# Altium PCB MP3_Player.PcbDoc (part 2 of 2)
Units mm, origin at the board's own origin, x right, y up, seen from the top; angles counter-clockwise.
Board outline 65.25 x 90.42 mm, 2 copper layers (Top Layer, Bottom Layer), stack 1.581 mm thick; 93 components, 53 nets, 312 pads, 294 vias.
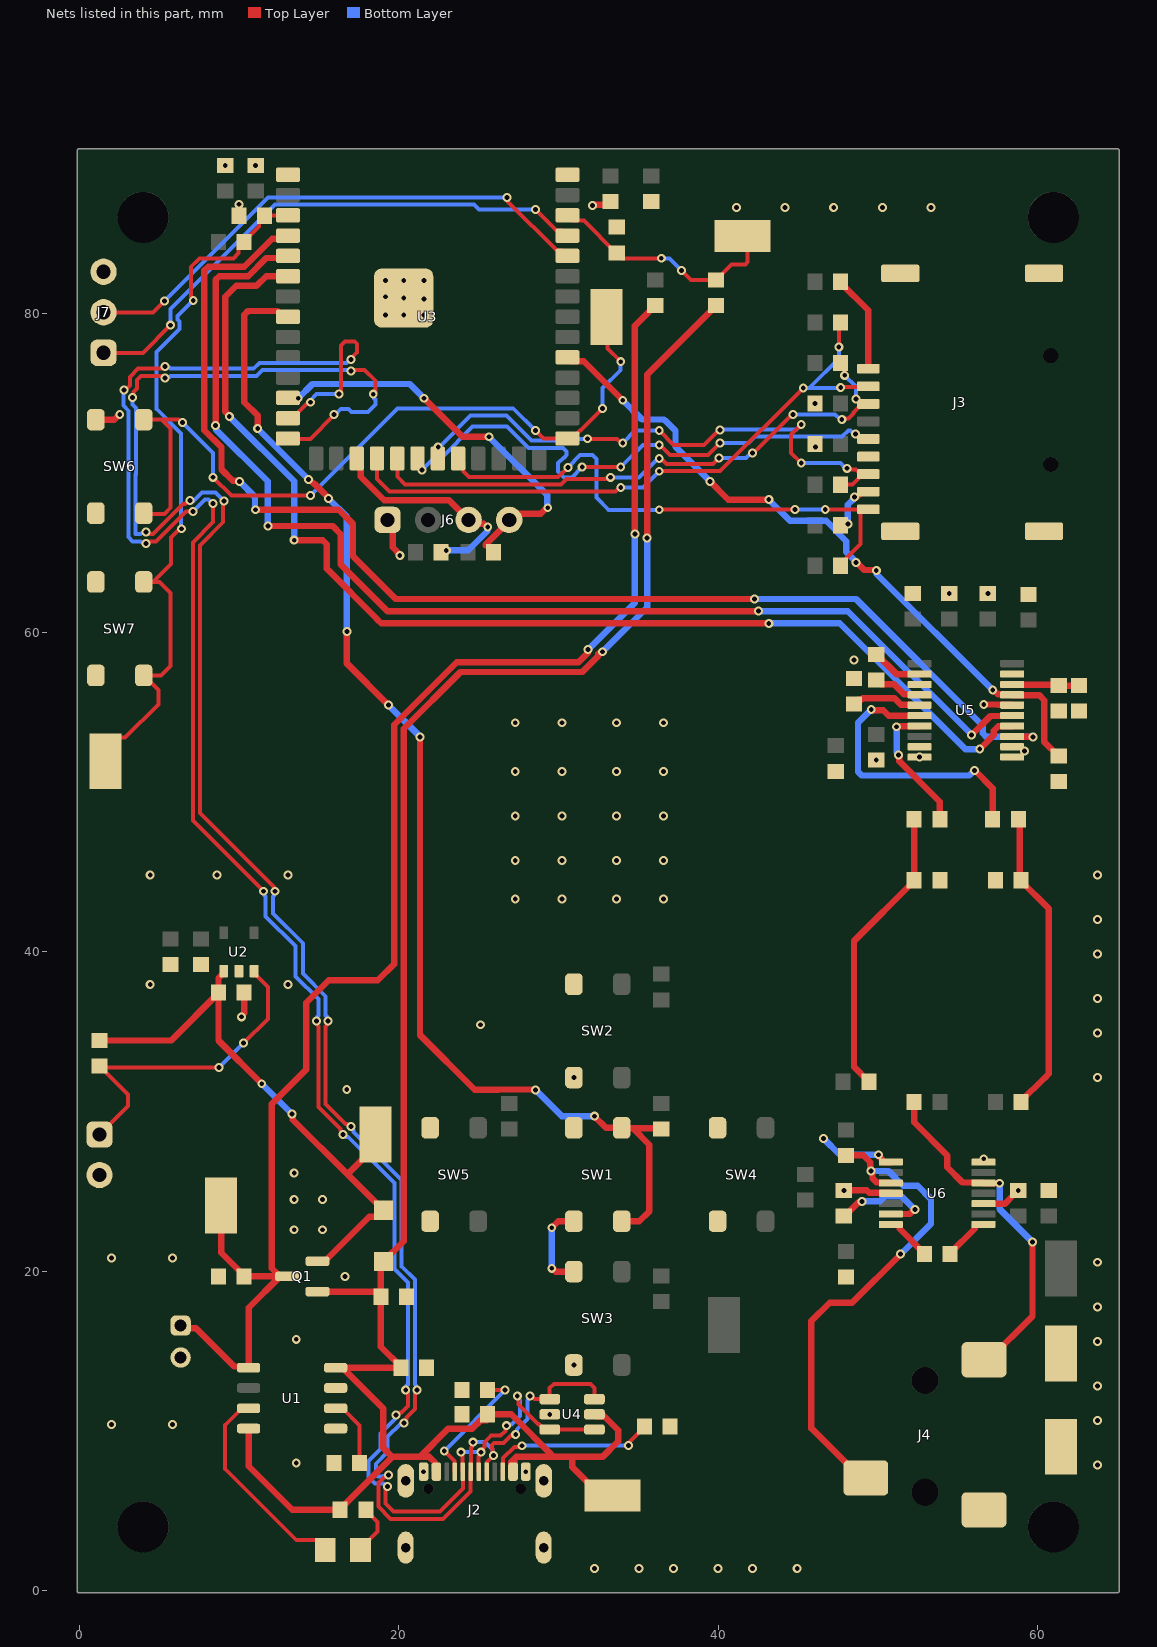
[diagram p2: the nets of this part, all layers, seen from the top]

## Via types
v1: diameter 0.559, hole 0.305, Top Layer to Bottom Layer, tented both sides, 294 vias

## Nets (pads, with @x,y where several pads share a name; then routed paths per layer and width w, separated by ;. In a path a pad name is that pad's centre, name@x,y a point inside that pad or via, vN(x,y) a via of type N, cw(c..) or ccw(c..) an arc to the next point about the centre after c; other vN are vias at no path point) (continued)
BTN_UP_N: R9.2 SW1.2 U3.8 | length 77.9
  Top Layer w0.4: v1(11.176,72.771) 11.176,73.593 10.339,74.431 10.339,79.903 10.573,80.137 12.409,80.137 12.77,79.776 U3.8@13.07,79.776 ; v1(14.351,69.596) 14.405,69.596 14.721,69.28 14.768,69.28 15.621,68.427 v1(15.621,68.391) ; v1(16.764,60.071) 16.764,58.062 v1(19.356,55.47) ; v1(21.336,53.467) 21.336,34.798 24.765,31.369 26.231,31.369 26.25,31.388 28.556,31.388 v1(28.575,31.369) ; v1(32.258,29.718) 32.988,28.988 SW1.2@33.974,28.988 34.009,28.953 34.671,28.953 ; SW1.2@33.974,23.138 35.076,23.138 35.687,23.749 35.687,27.94 34.674,28.953 34.671,28.953 ; R9.2@36.449,28.918 36.414,28.953 34.671,28.953
  Bottom Layer w0.4: v1(11.176,72.771) v1(14.351,69.596) ; v1(15.621,68.391) 16.764,67.248 v1(16.764,60.071) ; v1(19.356,55.47) 21.336,53.49 v1(21.336,53.467) ; v1(28.575,31.369) 30.226,29.718 v1(32.258,29.718)
DAC_L: C13.1 R26.2 R29.1 | length 19.2
  Top Layer w0.4: R26.2@58.801,48.307 58.884,48.224 58.884,44.58 C13.1@58.966,44.497 58.966,44.459 60.706,42.719 60.706,32.365 60.472,32.131 60.452,32.131 58.966,30.645 R29.1@58.966,30.607
DAC_R: C20.1 R27.2 R30.1 | length 18.4
  Top Layer w0.4: R30.1@49.441,31.877 48.514,32.804 48.514,40.687 52.286,44.459 C20.1@52.286,44.497 R27.2@52.286,48.307
DAC_XSMT: R32.2 U3.31 U5.17 | length 43.8
  Top Layer w0.4: U3.31@30.57,77.236 30.82,76.986 31.599,76.986 v1(34.036,74.549) ; v1(39.497,69.469) 40.514,68.452 40.64,68.326 v1(43.18,68.326) ; v1(48.641,64.389) 48.695,64.389 49.165,63.919 49.873,63.919 v1(49.911,63.881) ; v1(57.202,56.401) 57.24,56.362 57.303,56.362 57.538,56.127 58.396,56.127 58.446,56.077 60.128,56.077 60.433,55.772 60.433,53.152 61.303,52.282 R32.2@61.341,52.282
  Bottom Layer w0.4: v1(34.036,74.549) 35.241,73.344 36.612,73.344 36.677,73.279 36.703,73.279 37.338,72.644 37.338,71.628 v1(39.497,69.469) ; v1(43.18,68.326) 44.51,66.996 46.77,66.996 48.037,65.729 48.037,65.047 48.641,64.443 v1(48.641,64.389) ; v1(49.911,63.881) 49.949,63.843 49.949,63.653 v1(57.202,56.401)
DAT1: J3.8 R23.2 | length 3.4
  Top Layer w0.4: R23.2@47.663,66.722 47.705,66.764 48.095,66.764 v1(48.133,66.802) ; v1(48.551,68.48) 48.59,68.518 48.719,68.518 49.023,68.822 J3.8@49.413,68.822
  Bottom Layer w0.4: v1(48.133,66.802) 48.133,68.008 48.551,68.426 v1(48.551,68.48)
DAT2: J3.1 R24.2 | length 6.2
  Top Layer w0.4: R24.2@47.663,81.962 47.663,81.924 49.413,80.174 J3.1@49.413,76.522
EN: C9.1 R16.2 SW7.1 TP8.1 U3.3 | length 45.9
  Top Layer w0.25: TP8.1@1.651,51.943 1.651,52.551 2.526,53.426 2.88,53.426 4.953,55.499 4.953,56.407 SW7.1@4.04,57.32 5.123,57.32 5.715,57.912 5.715,62.484 5.029,63.17 4.623,63.17 ; SW7.1@4.04,63.17 4.623,63.17 ; v1(6.398,66.5) 6.315,66.5 6.236,66.421 6.223,66.421 5.751,65.949 5.751,64.298 4.623,63.17 ; v1(7.139,80.804) 7.139,80.899 6.985,81.053 6.985,82.893 7.531,83.439 9.652,83.439 9.98,83.767 9.98,84.11 R16.2@10.325,84.455 10.325,84.493 11.25,85.418 11.25,85.761 C9.1@11.595,86.106 11.615,86.126 U3.3@13.07,86.126
  Bottom Layer w0.25: v1(6.398,66.5) 6.379,66.519 6.379,72.463 4.826,74.016 4.826,77.572 6.272,79.017 6.272,79.479 6.146,79.604 6.146,79.811 v1(7.139,80.804)
GND: C1.1 C2.2 C3.2 C4.2 C5.2 C6.1 C7.2 C8.2 C9.2 C10.2 C11.2 C12.2 C13.2 C14.2 C15.2 C16.2 C17.2 C18.2 C19.2 C20.2 C21.2 C22.2 C25.2 C26.2 C27.2 C28.1 J1.2 J2.0 J2.A1/B12 J2.B1/A12 J3.6 J3.G1 J3.G2 J3.G3 J3.G4 J4.1 J5.2 J6.1 J7.3 R2.1 R3.1 R7.2 R8.1 R17.1 R18.1 R31.1 R32.1 SW1.1 SW2.1 SW3.1 SW4.1 SW5.1 SW6.1 SW7.2 TP7.1 TP17.1 U1.1 U1.3 U2.2 U3.1 U3.40 U3.41 U4.2 U5.3 U5.9 U5.10 U5.11 U5.12 U5.16 U5.19 U6.1 U6.4 U6.10 U6.14 | length 25.1
  Top Layer w0.4: SW6.1@1.04,73.33 2.19,73.33 2.52,73.66 v1(2.54,73.66) ; v1(10.16,35.941) 10.16,35.995 10.325,36.16 C3.2@10.325,37.465 ; J6.1@19.304,67.056 19.793,66.567 19.743,66.567 19.623,66.447 19.623,65.343 20.074,64.892 v1(20.074,64.837) ; v1(29.591,20.193) 29.645,20.193 29.85,19.988 SW3.1@30.974,19.988 ; v1(29.591,22.733) 29.996,23.138 SW1.1@30.974,23.138 ; v1(32.131,86.741) 32.169,86.779 33.049,86.779 C6.1@33.274,87.004 ; v1(47.879,25.057) 47.906,25.084 49.312,25.084 49.479,24.917 50.796,24.917 U6.4@50.821,24.892 ; v1(50.048,27.304) 50.048,27.25 50.271,27.027 50.271,26.867 50.296,26.842 U6.1@50.821,26.842 ; U6.10@56.621,24.242 57.971,24.242 58.493,24.764 58.493,24.787 58.763,25.057 v1(58.801,25.057) ; v1(56.642,55.499) 57.516,55.499 57.538,55.477 58.396,55.477 U5.16@58.421,55.452
  Bottom Layer w0.4: v1(29.591,20.193) v1(29.591,22.733) ; v1(46.609,28.321) 47.626,27.304 v1(50.048,27.304)
  other v1: 32.258,1.397 35.052,1.397 37.211,1.397 40.005,1.397 42.164,1.397 44.958,1.397 21.565,7.458 27.965,7.458 63.754,7.874 13.589,8.001 2.032,10.414 5.842,10.414 63.754,10.668 29.461,11.049 63.754,12.827 30.974,14.138 63.754,15.621 13.589,15.748 63.754,17.78 16.637,19.685 63.754,20.574 2.032,20.828 5.842,20.828 13.462,22.606 15.24,22.606 13.462,24.511 15.24,24.511 13.462,26.162 56.642,27.051 16.753,31.381 30.974,32.138 63.754,32.131 63.754,34.925 25.135,35.445 63.754,37.084 4.445,37.973 13.081,37.973 63.754,39.878 63.754,42.037 27.305,43.307 30.226,43.307 33.655,43.307 36.576,43.307 4.445,44.831 8.636,44.831 13.081,44.831 63.754,44.831 27.305,45.72 30.226,45.72 33.655,45.72 36.576,45.72 27.305,48.514 30.226,48.514 33.655,48.514 36.576,48.514 27.305,51.308 30.226,51.308 33.655,51.308 36.576,51.308 49.911,52.032 52.621,52.202 59.182,52.578 27.305,54.356 30.226,54.356 33.655,54.356 36.576,54.356 48.514,58.293 56.896,62.442 54.483,62.459 46.101,71.628 46.063,74.342 19.177,79.883 20.32,79.883 21.59,79.883 21.59,80.899 20.32,80.946 19.177,81.026 19.177,82.042 20.32,82.042 21.59,82.042 41.148,86.614 44.196,86.614 47.244,86.614 50.292,86.614 53.34,86.614 10.008,86.817 9.144,89.239 11.049,89.239
I2S_BCK: U3.4 U5.13 | length 80.1
  Top Layer w0.4: v1(10.033,69.469) 10.003,69.499 9.622,69.499 8.912,70.209 8.912,71.606 7.839,72.679 7.839,82.678 8.073,82.912 10.326,82.912 12.079,84.665 12.879,84.665 U3.4@13.07,84.856 ; v1(11.049,67.691) 16.256,67.691 17.145,66.802 17.145,64.77 19.812,62.103 v1(42.291,62.103) ; U5.13@58.421,53.502 58.438,53.484 59.716,53.484 v1(59.733,53.467) v1@59.771,53.429
  Bottom Layer w0.4: v1(10.033,69.469) 11.011,68.491 11.011,67.729 v1(11.049,67.691) ; v1(42.291,62.103) 48.641,62.103 56.58,54.164 56.58,53.701 56.814,53.467 v1(59.733,53.467)
I2S_DIN: U3.6 U5.14 | length 73.5
  Top Layer w0.4: v1(9.398,73.533) 9.398,73.587 9.139,73.846 9.139,81.021 9.83,81.712 11.1,81.712 11.704,82.316 U3.6@13.07,82.316 ; v1(13.462,65.786) 15.24,65.786 15.494,65.532 15.494,64.008 18.669,60.833 18.669,60.813 18.903,60.579 v1(43.18,60.579) ; v1(56.388,52.705) 57.271,53.588 57.271,53.86 57.538,54.127 58.396,54.127 U5.14@58.421,54.152
  Bottom Layer w0.4: v1(9.398,73.533) 13.462,69.469 v1(13.462,65.786) ; v1(43.18,60.579) 47.625,60.579 47.751,60.453 55.499,52.705 v1(56.388,52.705)
I2S_LRCK: U3.5 U5.15 | length 75.6
  Top Layer w0.4: v1(8.539,72.969) 8.539,82.078 8.773,82.312 10.574,82.312 11.721,83.459 12.943,83.459 U3.5@13.07,83.586 ; v1(11.811,66.675) 15.875,66.675 16.383,66.167 16.383,64.262 19.304,61.341 v1(42.545,61.341) ; v1(55.88,53.594) 57.063,54.777 58.396,54.777 U5.15@58.421,54.802
  Bottom Layer w0.4: v1(8.539,72.969) 8.569,72.939 8.569,72.711 11.811,69.469 v1(11.811,66.675) ; v1(42.545,61.341) 48.133,61.341 v1(55.88,53.594)
IO0: SW6.2 TP9.1 U3.27 | length 49.6
  Top Layer w0.25: SW6.2@4.04,67.48 4.083,67.437 5.334,67.437 5.715,67.818 5.715,72.771 5.156,73.33 ; SW6.2@4.04,73.33 5.156,73.33 ; v1(6.477,73.152) 6.382,73.152 6.204,73.33 5.156,73.33 ; v1(8.382,69.723) 9.525,68.58 v1(14.478,68.58) ; v1(28.575,72.644) 29.063,72.156 U3.27@30.57,72.156 30.87,72.156 31.365,72.651 31.389,72.651 32.766,74.028 v1(32.766,74.041) ; TP9.1@33.02,79.756 33.094,79.682 33.094,77.777 v1(33.909,76.962)
  Bottom Layer w0.25: v1(6.477,73.152) 8.382,71.247 v1(8.382,69.723) ; v1(14.478,68.58) 19.939,74.041 27.178,74.041 v1(28.575,72.644) ; v1(32.766,74.041) 32.766,75.311 33.909,76.454 v1(33.909,76.962)
IO43: J7.1 U3.37 | length 34.3
  Top Layer w0.25: J7.1@1.524,77.517 3.984,77.517 v1(5.715,79.248) ; v1(28.575,86.487) 29.881,85.181 30.245,85.181 U3.37@30.57,84.856
  Bottom Layer w0.25: v1(5.715,79.248) 5.715,80.264 12.25,86.799 24.712,86.799 25.024,86.487 v1(28.575,86.487)
IO44: J7.2 U3.36 | length 33.7
  Top Layer w0.25: J7.2@1.524,80.057 4.619,80.057 v1(5.334,80.772) ; v1(26.797,87.249) 26.864,87.182 26.864,86.968 29.921,83.911 30.245,83.911 U3.36@30.57,83.586
  Bottom Layer w0.25: v1(5.334,80.772) 11.811,87.249 v1(26.797,87.249)
NetC23_1: C23.1 U5.2 | length 3.2
  Top Layer w0.4: C23.1@49.911,58.632 49.949,58.632 51.179,57.402 U5.2@52.621,57.402
NetC23_2: C23.2 U5.4 | length 3.1
  Top Layer w0.4: C23.2@49.911,57.032 50.181,56.762 51.019,56.762 51.654,56.127 52.596,56.127 U5.4@52.621,56.102
NetC24_1: C24.1 U6.8 | length 3
  Top Layer w0.4: C24.1@54.521,21.082 54.521,21.12 56.071,22.67 56.071,22.917 56.096,22.942 U6.8@56.621,22.942
NetC24_2: C24.2 U6.7 | length 3
  Top Layer w0.4: U6.7@50.821,22.942 51.346,22.942 51.371,22.917 51.371,22.67 52.921,21.12 C24.2@52.921,21.082
NetC25_1: C25.1 U5.5 | length 4.4
  Top Layer w0.4: C25.1@48.514,55.524 48.784,55.794 48.971,55.794 49.056,55.88 51.052,55.88 51.455,55.477 51.937,55.477 52.071,55.477 52.096,55.452 U5.5@52.621,55.452
NetC26_1: C26.1 C27.1 U5.18 | length 4.4
  Top Layer w0.4: U5.18@58.421,56.752 58.446,56.727 C27.1@61.341,56.727 ; C27.1@61.341,56.68 C26.1@62.611,56.68 C26.1@62.801,56.68
NetC28_2: C28.2 U6.6 | length 6.9
  Top Layer w0.4: C28.2@47.879,23.457 47.917,23.457 48.806,24.346 48.984,24.346 v1(49.022,24.384) ; U6.6@50.821,23.592 51.997,23.592 52.281,23.876 v1(52.324,23.876)
  Bottom Layer w0.4: v1(49.022,24.384) 50.141,24.384 50.446,24.689 51.511,24.689 v1(52.324,23.876)
NetD2_1: D2.1 R1.1 | length 3.3
  Top Layer w0.25: D2.1@17.61,2.54 17.61,2.64 18.669,3.699 18.669,4.318 17.945,5.042 R1.1@17.945,5.08
NetD2_2: D2.2 U1.7 | length 13.1
  Top Layer w0.25: U1.7@10.61,11.43 10.185,11.43 9.144,10.389 9.144,7.62 13.599,3.165 14.885,3.165 15.41,2.64 D2.2@15.41,2.54
NetJ2_A5: J2.A5 R17.2 | length 8.1
  Top Layer w0.25: v1(22.86,8.763) 23.49,8.133 23.49,7.482 J2.A5@23.515,7.458 ; R17.2@25.565,12.573 v1(26.67,12.573)
  Bottom Layer w0.25: v1(22.86,8.763) v1(26.67,12.573)
NetJ2_B5: J2.B5 R18.2 | length 10.6
  Top Layer w0.25: J2.B5@26.515,7.458 26.54,7.482 26.54,8.301 27.255,9.016 27.658,9.016 v1(27.725,9.082) ; v1(34.395,9.103) 34.462,9.17 34.462,9.316 35.395,10.249 R18.2@35.395,10.287
  Bottom Layer w0.25: v1(27.725,9.082) 34.374,9.082 v1(34.395,9.103)
NetR3_2: R3.2 U1.2 | length 4.3
  Top Layer w0.25: U1.2@16.06,11.43 16.485,11.43 17.564,10.351 R3.2@17.564,8.001
NetR26_1: R26.1 U5.6 | length 18.5
  Top Layer w0.4: v1(49.595,55.18) 49.633,55.142 50.355,55.142 50.695,54.802 U5.6@52.621,54.802 ; v1(56.07,51.371) 57.201,50.241 R26.1@57.201,48.307
  Bottom Layer w0.4: v1(49.595,55.18) 48.768,54.353 48.768,51.288 49.002,51.054 55.736,51.054 56.054,51.371 v1(56.07,51.371)
NetR27_1: R27.1 U5.7 | length 8.4
  Top Layer w0.4: v1(51.181,54.102) 51.206,54.127 52.596,54.127 U5.7@52.621,54.152 ; v1(51.308,52.324) 51.346,52.286 51.346,51.955 53.886,49.415 R27.1@53.886,48.307
  Bottom Layer w0.4: v1(51.181,54.102) 51.181,52.505 51.308,52.378 v1(51.308,52.324)
OLED_SCL: J6.3 R14.1 U3.17 | length 14.3
  Top Layer w0.4: U3.17@17.375,70.906 17.625,70.656 17.625,69.751 19.095,68.281 23.159,68.281 24.623,66.817 25.331,66.817 25.526,66.622 v1(25.58,66.622) ; R14.1@22.644,65.024 22.771,65.151 v1(22.987,65.151)
  Bottom Layer w0.4: v1(22.987,65.151) 24.354,65.151 25.542,66.339 25.542,66.584 v1(25.58,66.622)
OLED_SDA: J6.4 R13.1 U3.12 | length 25.5
  Top Layer w0.4: U3.12@13.07,74.696 13.08,74.686 13.706,74.686 v1(13.716,74.676) ; v1(21.59,74.676) 24.003,72.263 v1(25.654,72.263) ; 25.438,65.452 25.438,65.49 26.685,66.737 26.685,67.198 26.924,67.437 28.902,67.437 29.283,67.818 v1(29.337,67.818)
  Bottom Layer w0.4: v1(13.716,74.676) 14.605,75.565 20.701,75.565 v1(21.59,74.676) ; v1(25.654,72.263) 29.299,68.618 29.299,67.856 v1(29.337,67.818)
OUT_L: J4.2 R25.1 U6.12 | length 22
  Top Layer w0.4: R25.1@52.286,30.607 52.286,29.329 54.356,27.259 54.356,26.523 55.312,25.567 56.596,25.567 56.633,25.53 57.619,25.53 v1(57.631,25.518) ; J4.2@56.659,14.467 56.959,14.467 59.69,17.198 v1(59.69,21.844)
  Bottom Layer w0.4: v1(57.631,25.518) 57.631,23.903 v1(59.69,21.844)
OUT_R: J4.3 R28.1 U6.3 | length 31.4
  Top Layer w0.4: R28.1@48.006,27.267 49.096,27.267 49.533,26.83 49.533,26.327 v1(49.571,26.289) ; J4.3@49.259,7.067 48.959,7.067 45.866,10.16 45.827,10.16 45.827,16.871 46.99,18.034 48.387,18.034 v1(51.435,21.082) ; v1@49.609,26.241 49.609,26.197 49.671,26.135 49.671,25.834 49.938,25.567 50.746,25.567 U6.3@50.771,25.542
  Bottom Layer w0.4: v1(49.571,26.289) 50.673,26.289 51.597,25.365 52.506,25.365 53.34,24.531 53.34,22.987 v1(51.435,21.082)
PWR_EN: J5.1 R6.2 U2.3 | length 20.8
  Top Layer w0.25: J5.1@1.27,28.575 3.048,30.353 3.048,31.077 R6.2@1.359,32.766 ; R6.2@1.27,32.855 R6.2@1.359,32.766 ; v1(8.763,32.766) R6.2@1.359,32.766 ; v1(10.287,34.29) 11.811,35.814 11.811,37.814 10.95,38.675 U2.3@10.95,38.8
  Bottom Layer w0.25: v1(8.763,32.766) v1(10.287,34.29)
SD_CD_N: J3.CD R22.1 U3.22 | length 34.3
  Top Layer w0.25: U3.22@23.725,70.906 24.05,70.581 24.05,70.1 24.416,69.734 29.988,69.734 v1(30.602,70.348) ; v1(36.322,67.691) 36.327,67.696 44.815,67.696 v1(44.82,67.701) ; v1(46.714,67.696) 46.727,67.709 49.4,67.709 J3.CD@49.413,67.722 49.1,67.722 48.916,67.537 48.916,65.553 48.008,64.645 48.008,64.527 R22.1@47.663,64.182
  Bottom Layer w0.25: v1(30.602,70.348) 31.369,71.115 32.136,71.115 32.385,70.866 32.385,68.453 33.147,67.691 v1(36.322,67.691) ; v1(44.82,67.701) 44.823,67.699 46.711,67.699 v1(46.714,67.696)
SD_CS: J3.2 R19.1 U3.18 | length 40
  Top Layer w0.25: U3.18@18.645,70.906 18.645,69.63 19.441,68.834 33.588,68.834 33.842,69.088 v1(33.909,69.088) ; v1(36.322,70.104) 40.132,70.104 v1(45.339,75.311) ; v1(47.563,77.89) 47.563,79.322 R19.1@47.663,79.422 ; v1(47.683,75.35) 47.719,75.386 49.377,75.386 J3.2@49.413,75.422
  Bottom Layer w0.25: v1(33.909,69.088) 35.306,69.088 v1(36.322,70.104) ; v1(45.339,75.311) 45.358,75.33 45.72,75.33 ; v1(47.563,77.89) 47.563,77.173 45.72,75.33 ; v1(47.683,75.35) 47.664,75.33 45.72,75.33
SD_MISO: J3.7 R21.1 U3.21 | length 35.7
  Top Layer w0.25: U3.21@22.455,70.906 22.455,71.604 v1(22.479,71.628) ; v1(31.82,72.136) 33.687,72.136 33.941,71.882 v1(34.036,71.882) ; v1(36.322,72.644) 37.211,71.755 39.121,71.755 40.048,72.682 v1(40.132,72.682) ; v1(45.212,70.612) 44.577,71.247 44.577,72.39 v1(45.212,73.025) ; R21.1@47.663,69.262 48.429,69.262 49.089,69.922 J3.7@49.413,69.922 49.228,70.107 48.744,70.107 48.632,70.22 48.144,70.22 v1(48.077,70.287)
  Bottom Layer w0.25: v1(22.479,71.628) 22.546,71.628 24.509,73.591 26.744,73.591 28.316,72.019 29.962,72.019 30.079,72.136 31.369,72.136 v1(31.82,72.136) ; v1(34.036,71.882) 34.798,72.644 v1(36.322,72.644) ; v1(40.132,72.682) 40.181,72.731 44.918,72.731 v1(45.212,73.025) ; v1(45.212,70.612) 47.657,70.612 47.983,70.287 v1(48.077,70.287)
SD_MOSI: J3.3 R20.1 U3.19 | length 36.7
  Top Layer w0.25: U3.19@19.915,70.906 19.915,69.762 20.393,69.284 30.175,69.284 30.506,69.615 32.953,69.615 32.993,69.656 33.207,69.656 v1(33.274,69.723) ; v1(36.322,70.904) 36.417,70.904 36.767,70.554 39.698,70.554 v1(40.071,70.927) ; v1(42.161,71.25) 42.227,71.25 44.638,73.66 v1(44.704,73.66) ; R20.1@47.663,76.882 47.933,76.612 v1(47.933,76.11) ; v1(47.752,73.334) 47.819,73.401 48.16,73.401 48.484,73.726 48.484,73.783 J3.3@49.023,74.322 ; v1(48.633,74.634) 48.711,74.634 J3.3@49.023,74.322 ; J3.3@49.413,74.322 J3.3@49.023,74.322
  Bottom Layer w0.25: v1(33.274,69.723) 35.057,69.723 36.238,70.904 v1(36.322,70.904) ; v1(40.071,70.927) 41.744,70.927 42.067,71.25 v1(42.161,71.25) ; v1(44.704,73.66) 47.331,73.66 47.657,73.334 v1(47.752,73.334) ; v1(47.933,76.11) 48.633,75.41 v1(48.633,74.634)
SD_SCK: J3.5 U3.20 | length 34.8
  Top Layer w0.25: U3.20@21.185,70.906 21.209,70.882 21.209,70.319 21.317,70.319 v1(21.463,70.173) ; v1(31.496,70.358) v1(33.909,70.358) ; v1(36.322,71.755) 36.355,71.755 36.99,71.12 39.38,71.12 40.132,71.872 v1(40.132,71.882) ; v1(48.616,72.439) 48.706,72.439 49.023,72.122 J3.5@49.413,72.122
  Bottom Layer w0.25: v1(21.463,70.173) 22.293,71.003 22.738,71.003 24.633,72.898 26.801,72.898 28.13,71.569 30.285,71.569 30.527,71.327 30.527,71.119 30.381,70.973 30.343,70.973 29.977,70.607 29.977,70.089 30.343,69.723 30.861,69.723 v1(31.496,70.358) ; v1(33.909,70.358) 35.306,71.755 v1(36.322,71.755) ; v1(40.132,71.882) 41.91,71.882 42.309,72.281 47.77,72.281 48.156,72.667 48.293,72.667 48.521,72.439 v1(48.616,72.439)
USB_DN: J2.A7 J2.B7 U3.13 U4.3 U4.4 | length 133.5
  Top Layer w0.25: v1(2.794,75.184) 2.874,75.184 3.175,75.485 3.175,76.005 3.693,76.523 5.207,76.523 5.338,76.654 v1(5.383,76.654) ; v1(4.191,65.586) 4.191,65.59 4.318,65.717 4.819,65.717 6.691,67.588 7.116,67.588 v1(7.118,67.586) ; v1(8.382,68.072) 8.382,66.915 7.112,65.645 7.112,48.24 v1(11.547,43.806) ; U3.13@13.07,73.426 13.37,73.426 14.307,74.363 14.419,74.363 v1(14.478,74.422) ; v1(14.856,35.687) 14.915,35.628 14.915,35.414 14.986,35.342 14.986,30.283 16.358,28.911 16.358,28.81 16.51,28.659 v1(16.51,28.575) ; v1(16.256,74.93) 16.383,75.057 16.383,77.978 16.637,78.232 17.253,78.232 17.399,78.086 17.399,77.554 17.018,77.173 v1(17.018,77.089) ; v1(19.308,6.532) 19.177,6.401 19.177,5.461 19.685,4.953 22.58,4.953 24.04,6.413 24.04,7.433 J2.B7@24.015,7.458 24.015,8.484 23.915,8.584 v1(23.915,8.679) ; v1(19.846,11.015) 19.93,11.015 20.081,11.167 20.182,11.167 20.574,11.558 20.574,12.446 20.447,12.573 v1(20.443,12.573) ; J2.A7@25.015,7.458 24.99,7.482 24.99,8.409 25.165,8.584 v1(25.165,8.679) 25.165,8.774 25.39,8.999 25.39,9.301 25.8,9.711 26.39,9.711 26.691,10.012 26.691,10.27 v1(26.758,10.337) ; v1(27.432,12.192) 27.499,12.125 27.499,11.672 28.772,10.399 28.816,10.399 29.116,10.099 U4.3@29.461,10.099 U4.4@32.261,10.099
  Bottom Layer w0.25: v1(2.794,75.184) 2.779,75.169 2.779,74.209 3.097,73.891 3.097,70.089 3.087,70.078 3.087,65.981 3.35,65.717 3.846,65.717 3.918,65.645 4.132,65.645 v1(4.191,65.586) ; v1(5.383,76.654) 5.442,76.595 5.656,76.595 5.728,76.523 10.928,76.523 11.292,76.887 16.732,76.887 16.934,77.089 v1(17.018,77.089) ; v1(7.118,67.586) 7.13,67.586 7.874,68.329 8.081,68.329 8.339,68.072 v1(8.382,68.072) ; v1(11.547,43.806) 11.606,43.747 11.606,43.532 11.677,43.461 11.677,42.234 13.551,40.361 13.551,38.478 14.986,37.042 14.986,36.032 14.915,35.96 14.915,35.746 v1(14.856,35.687) ; v1(14.478,74.422) 14.478,74.549 14.859,74.93 v1(16.256,74.93) ; v1(16.51,28.575) 16.594,28.575 16.745,28.423 16.846,28.423 19.743,25.527 19.743,20.135 20.574,19.304 20.574,12.918 20.502,12.846 20.502,12.632 v1(20.443,12.573) ; v1(19.308,6.532) 19.224,6.532 19.045,6.711 18.529,6.711 18.119,7.122 18.119,8.132 18.859,8.872 18.859,9.843 19.787,10.771 19.787,10.956 v1(19.846,11.015) ; v1(23.915,8.679) v1(25.165,8.679) ; v1(26.758,10.337) 26.825,10.404 27.062,10.404 27.607,10.949 27.607,11.922 27.432,12.097 v1(27.432,12.192)
USB_DP: J2.A6 J2.B6 U3.14 U4.1 U4.6 | length 136.4
  Top Layer w0.25: v1(3.336,74.72) 3.395,74.779 3.395,75.068 3.625,75.298 3.625,75.819 3.879,76.073 5.207,76.073 5.338,75.942 v1(5.383,75.942) ; v1(4.191,66.298) 4.191,66.294 4.318,66.167 4.633,66.167 6.504,68.038 6.617,68.038 6.852,68.273 v1(6.936,68.273) ; v1(9.072,68.246) 9.013,68.187 9.013,66.909 7.562,65.459 7.562,48.716 12.199,44.079 12.199,43.865 v1(12.258,43.806) ; U3.14@13.07,72.156 13.09,72.136 14.478,72.136 15.959,73.617 v1(15.959,73.663) ; v1(15.567,35.687) 15.508,35.628 15.508,35.414 15.436,35.342 15.436,30.47 16.677,29.229 16.778,29.229 16.929,29.078 v1(17.013,29.078) ; v1(17.018,76.378) 17.077,76.437 17.617,76.437 17.621,76.44 17.871,76.44 18.542,75.769 18.542,75.057 v1(18.411,74.927) ; v1(19.37,7.249) 19.286,7.249 19.125,7.088 19.077,7.088 18.727,6.738 18.727,5.275 19.499,4.503 22.767,4.503 24.49,6.226 24.49,6.958 24.49,7.433 J2.A6@24.515,7.458 24.54,7.482 24.54,8.938 24.599,8.997 24.599,9.237 v1(24.666,9.304) ; v1(20.349,10.512) 20.349,10.596 20.5,10.747 20.5,10.848 21.024,11.372 21.024,12.446 21.151,12.573 v1(21.155,12.573) ; J2.B6@25.515,7.458 25.54,7.482 25.54,8.052 25.94,8.453 v1(25.94,8.483) 25.874,8.549 25.874,8.874 25.84,8.907 25.84,9.114 25.986,9.261 26.576,9.261 27.027,9.712 27.264,9.712 v1(27.331,9.779) ; v1(28.232,12.192) 28.327,12.192 28.52,11.999 U4.1@29.461,11.999 29.461,12.697 29.718,12.954 32.004,12.954 32.261,12.697 U4.6@32.261,11.999
  Bottom Layer w0.25: v1(3.336,74.72) 3.333,74.717 3.333,74.291 3.547,74.077 3.547,69.902 3.537,69.892 3.537,66.167 3.846,66.167 3.918,66.239 4.132,66.239 v1(4.191,66.298) ; v1(5.383,75.942) 5.442,76.001 5.656,76.001 5.728,76.073 11.115,76.073 11.479,76.437 16.959,76.437 v1(17.018,76.378) ; v1(6.936,68.273) 6.955,68.254 7.162,68.254 7.688,68.779 8.538,68.779 v1(9.072,68.246) ; v1(12.258,43.806) 12.199,43.747 12.199,43.532 12.127,43.461 12.127,42.421 14.001,40.547 14.001,38.664 15.436,37.228 15.436,36.032 15.508,35.96 15.508,35.746 v1(15.567,35.687) ; v1(15.959,73.663) 16.043,73.663 16.377,73.997 16.866,73.997 17.047,73.815 18.085,73.815 18.542,74.272 18.542,74.582 18.47,74.653 18.47,74.868 v1(18.411,74.927) ; v1(17.013,29.078) 17.013,28.994 17.164,28.843 17.164,28.742 20.193,25.713 20.193,20.321 21.024,19.49 21.024,12.918 21.096,12.846 21.096,12.632 v1(21.155,12.573) ; v1(19.37,7.249) 19.311,7.19 19.041,7.19 19.012,7.161 18.715,7.161 18.569,7.308 18.569,7.946 19.309,8.686 19.309,9.657 20.105,10.453 20.29,10.453 v1(20.349,10.512) ; v1(24.666,9.304) 25.424,9.304 25.874,8.854 25.874,8.549 v1(25.94,8.483) ; v1(27.331,9.779) 27.398,9.846 27.398,10.104 28.057,10.763 28.057,11.922 28.232,12.097 v1(28.232,12.192)
VBAT: C1.2 J1.1 Q1.3 R4.2 TP2.1 U1.5 | length 96.9
  Top Layer w0.4: J1.1@6.35,16.605 6.519,16.436 7.313,16.436 9.702,14.047 10.533,14.047 U1.5@10.61,13.97 10.61,17.725 Q1.3@12.57,19.685 ; TP2.1@8.89,24.13 8.89,21.158 10.325,19.723 C1.2@10.325,19.685 Q1.3@12.57,19.685 ; Q1.3@13.02,19.685 Q1.3@12.57,19.685 ; v1(31.862,58.934) 31.834,58.906 31.834,58.717 31.262,58.146 23.642,58.146 23.515,58.019 19.72,54.224 19.72,39.243 18.704,38.227 15.621,38.227 14.224,36.83 14.224,32.639 12.065,30.48 12.065,20.19 Q1.3@12.57,19.685 ; v1(34.798,66.167) 34.798,79.21 35.76,80.172 35.76,80.21 36.03,80.48 R4.2@36.068,80.48
  Bottom Layer w0.4: v1(31.862,58.934) 34.798,61.87 v1(34.798,66.167)
VBUS: C2.1 C10.1 D1.2 J2.A4/B9 J2.B4/A9 Q1.1 R1.2 R2.2 R5.1 TP1.1 U1.4 U1.8 U4.5 | length 138
  Top Layer w0.4: U1.8@10.61,10.16 10.61,7.805 13.335,5.08 R1.2@16.345,5.08 ; Q1.1@14.92,18.735 18.603,18.735 18.885,18.453 18.885,20.46 D1.2@19.05,20.625 20.32,21.895 20.32,53.975 23.876,57.531 31.496,57.531 32.512,58.547 32.512,58.674 32.585,58.674 32.712,58.801 v1(32.766,58.801) ; U1.4@16.06,13.97 U1.4@16.485,13.97 ; R1.2@16.345,5.118 19.609,8.383 ; R2.2@18.885,18.415 18.885,15.278 20.155,14.008 C2.1@20.155,13.97 U1.4@16.485,13.97 ; J2.A4/B9@22.365,7.458 22.265,7.558 22.265,8.04 21.922,8.383 21.337,8.383 ; C10.1@25.527,10.668 25.127,10.668 24.6,10.141 23.095,10.141 21.337,8.383 ; C10.1@25.565,11.049 27.051,11.049 29.717,8.383 ; 27.265,8.04 27.265,7.558 J2.B4/A9@27.165,7.458 27.065,7.558 27.065,8.084 27.364,8.383 29.717,8.383 ; U4.5@32.261,11.049 32.386,10.924 32.881,10.924 33.743,10.062 33.743,9.359 32.767,8.383 30.861,8.383 ; TP1.1@33.401,5.969 32.651,5.969 30.861,7.759 30.861,8.383 ; v1(35.56,65.913) 35.56,76.162 39.57,80.172 39.57,80.21 39.84,80.48 R5.1@39.878,80.48 ; U1.4@16.485,13.97 19.05,11.405 19.05,8.942 19.609,8.383 ; 19.609,8.383 21.337,8.383 ; 29.717,8.383 30.861,8.383
  Bottom Layer w0.4: v1(32.766,58.801) 35.56,61.595 v1(35.56,65.913)
VBUS_DET: R5.2 R7.1 TP3.1 U3.38 | length 15.2
  Top Layer w0.25: U3.38@30.57,86.126 30.895,85.801 31.598,85.801 33.617,83.782 R7.1@33.655,83.782 33.998,83.439 v1(36.449,83.439) ; v1(37.719,82.677) 38.316,82.08 R5.2@39.878,82.08 40.856,83.058 41.714,83.058 41.86,83.204 41.86,84.505 TP3.1@41.529,84.836
  Bottom Layer w0.25: v1(36.449,83.439) 36.957,83.439 v1(37.719,82.677)
VSYS: C3.1 D1.1 Q1.2 R6.1 TP5.1 U2.1 | length 36.8
  Top Layer w0.4: R6.1@1.27,34.455 5.753,34.455 8.725,37.427 C3.1@8.725,37.465 ; U2.1@9.05,38.8 9.05,38.675 8.975,38.6 8.959,38.6 8.725,38.366 C3.1@8.725,37.465 ; v1(11.43,31.75) 8.725,34.455 C3.1@8.725,37.465 ; v1(13.335,29.845) 13.373,29.807 13.373,29.502 16.802,26.073 ; Q1.2@14.92,20.635 15.37,20.635 18.16,23.425 18.65,23.425 D1.1@19.05,23.825 16.802,26.073 ; TP5.1@18.542,28.575 18.542,27.825 16.802,26.085 16.802,26.073
  Bottom Layer w0.4: v1(11.43,31.75) v1(13.335,29.845)
pads on no net: J2. J2.A8 J2.B8 J3.NP1 J3.NP2 J4.NP1 J4.NP2 U1.6 U2.4 U3.15 U3.16 U3.24 U3.25 U3.26 U3.28 U3.29 U3.30 U3.32 U3.33 U3.34 U3.35 U6.11

## Polygon pours and split planes (outlines as drawn)
GND on Bottom Layer "GND_L02_P001" (solid, remove dead copper, pour order 1): 0.127,0.127 64.897,0.127 64.897,90.043 0.127,90.043
GND on Top Layer "GND_L01_P002" (solid, remove dead copper, pour order 2): 0.127,90.043 0.127,0.127 64.77,0.127 64.77,90.043

## Silkscreen, mask and mechanical layers (free items; w line width, h text height)
Top Overlay:
  text "MICRO SD" at 51.435,83.439 h0.76
  text "UART" at 2.667,74.676 h0.76
  text "BOOT" at 6.604,69.215 h0.76 r90
  text "PANTALLA" at 30.607,65.786 h0.76
  text "RST" at 6.604,59.182 h0.76 r90
  text "VOL+" at 31.242,38.862 h0.76
  text "PREV" at 22.098,29.845 h0.76
  text "PLAY/PAUSE" at 28.194,29.845 h0.76
  text "NEXT" at 40.005,29.845 h0.76
  text "ON/OFF" at 0.381,22.225 h0.76
  text "VOL-" at 31.242,20.701 h0.76
  text "BATERIA" at 0.381,18.923 h0.76
  text "USB-C" at 29.972,2.032 h0.76
  text "AUDIO" at 44.831,1.905 h0.76
Bottom Overlay:
  drawing of 875 lines, arcs and shapes, not listed
  text "GND" at 3.175,81.915 h0.76
  text "TX" at 3.175,79.375 h0.76
  text "RX" at 3.175,76.835 h0.76
  text "GND" at 18.796,64.897 h0.76 r270
  text "VCC" at 21.463,64.516 h0.76 r270
  text "SCL" at 24.003,64.516 h0.76 r270
  text "SDA" at 26.67,64.516 h0.76 r270
  text "EN" at 2.921,27.813 h0.76
  text "GND" at 2.921,25.273 h0.76
  text "+" at 8.128,17.145 h0.76
  text "-" at 8.128,12.319 h0.76
Board Shape:
  lines w0.254: 0,0 0,90.17 16.42,90.17 48.58,90.17 49.936,90.17 51.627,90.17 52.982,90.17 60.767,90.17 65,90.17 65,0 0,0

## Dimensions
65,90.17 to 65,0 on Board Shape
0,90.17 to 65,90.17 on Board Shape